# Altium PCB PINTY-FUJI-CARD-PCB-v1.1_2026-11-04.pcbdoc (part 1 of 2)
Units mil, origin at the board's own origin, x right, y up, seen from the top; angles counter-clockwise.
Board outline 3304.99 x 3610.47 mil, 2 copper layers (Top Layer, Bottom Layer); 76 components, 76 nets, 376 pads, 156 vias.
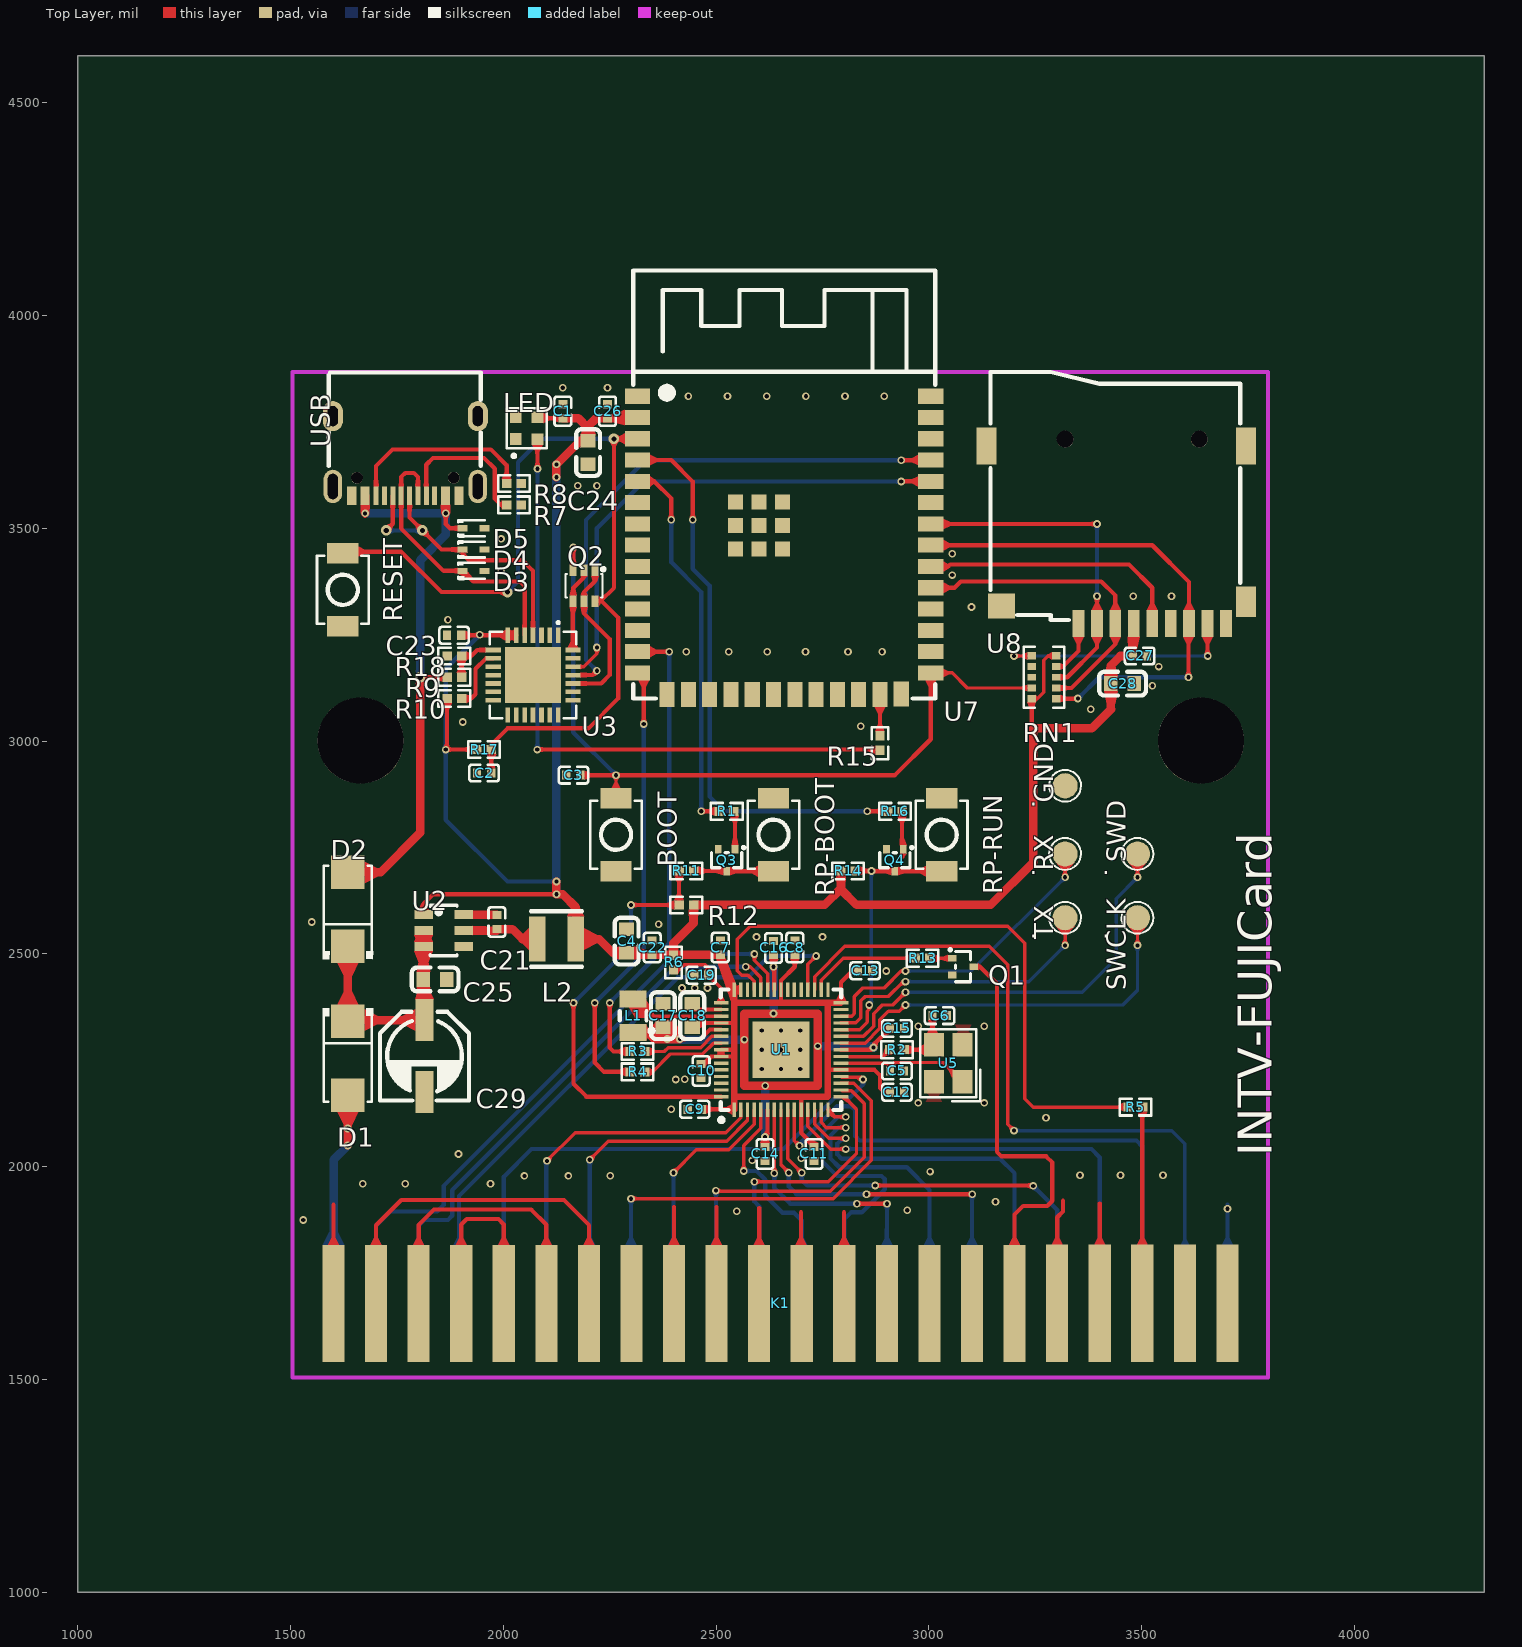
[diagram p0: Top Layer view]
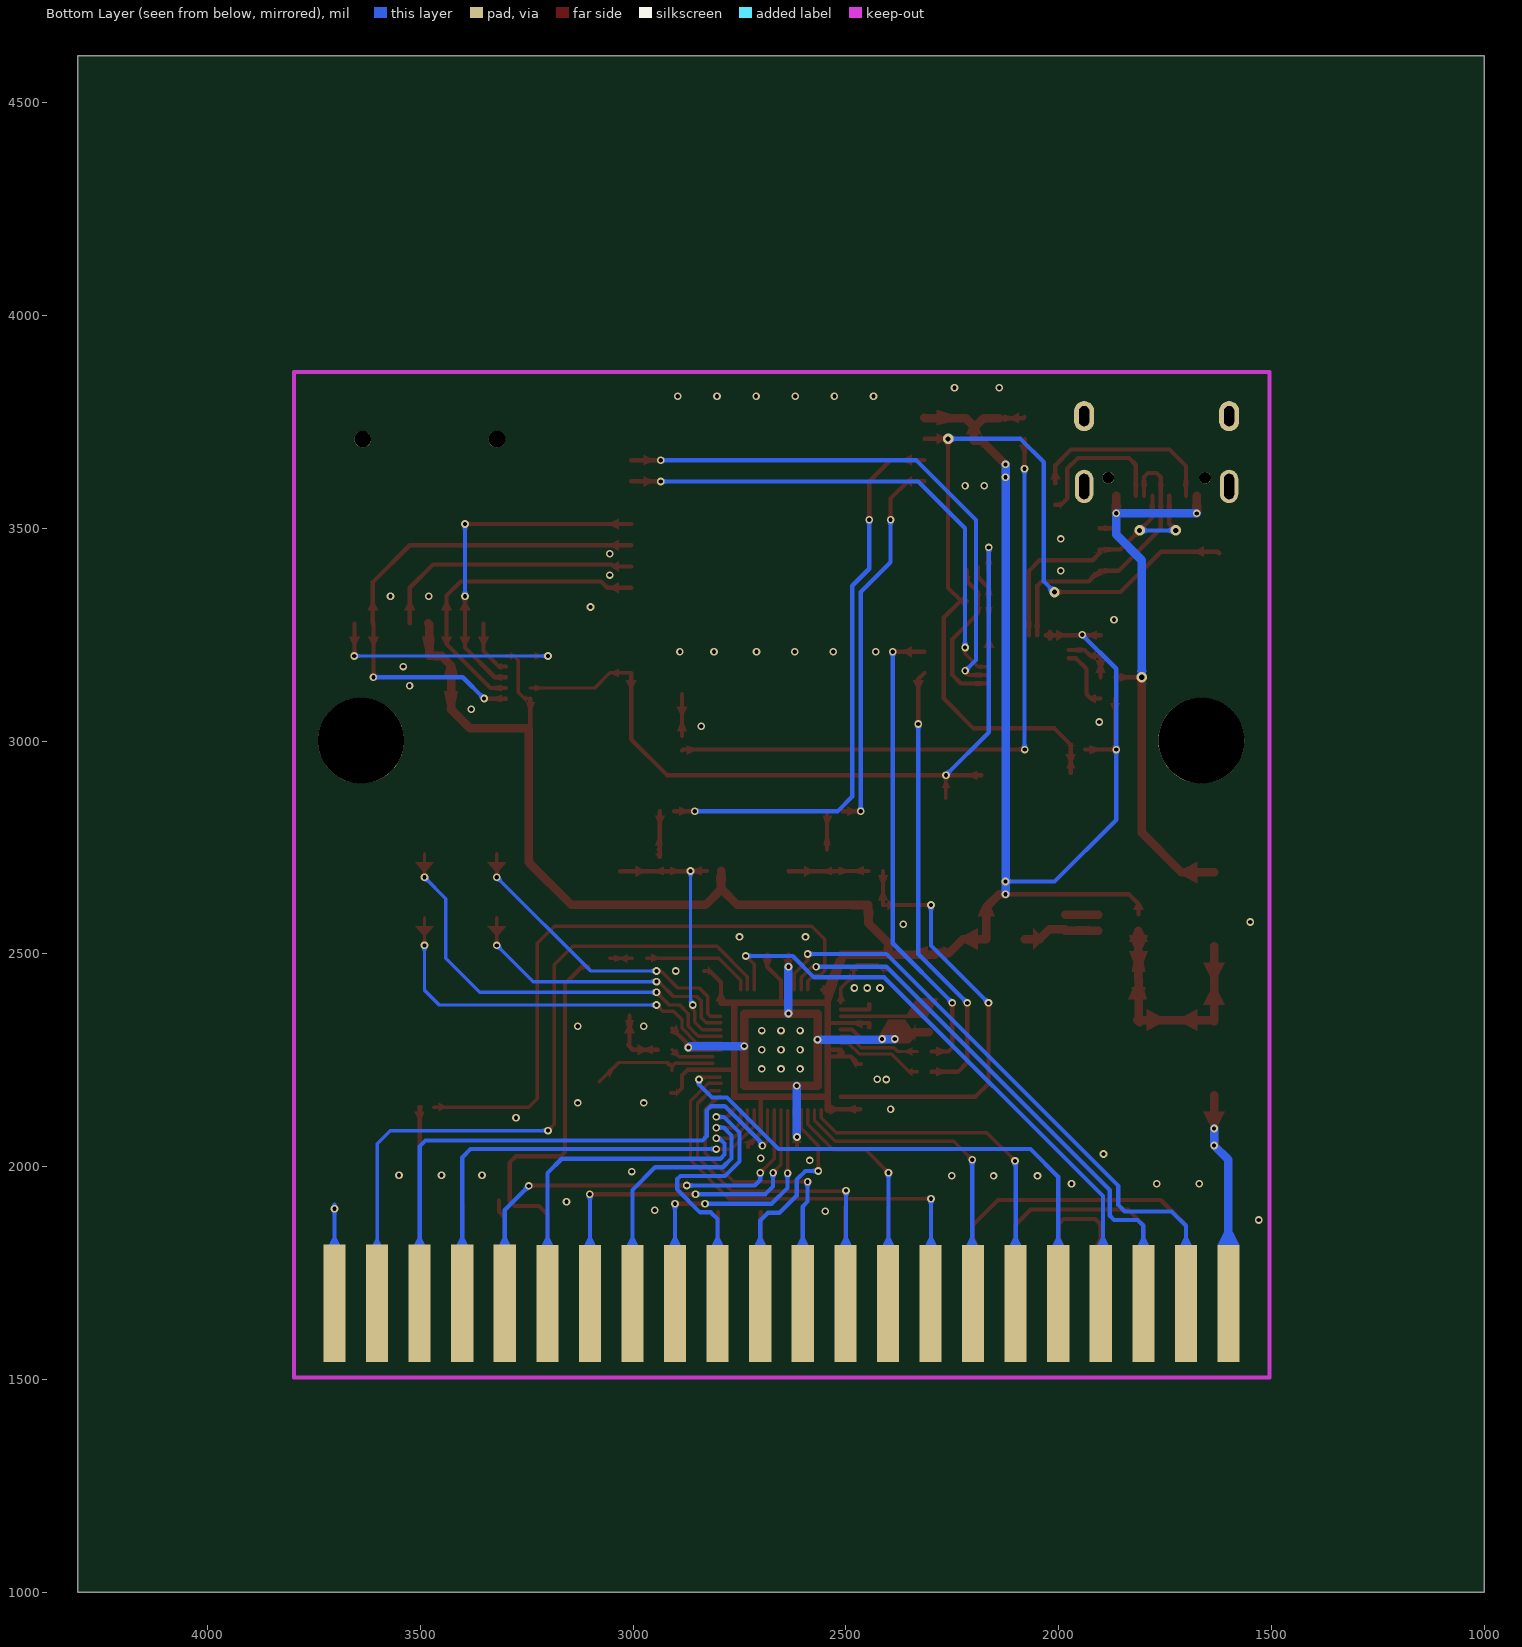
[diagram p1: Bottom Layer view, seen from below]

## Layer stack, top to bottom
Top Layer: signal copper (thickness not stored)
Dielectric: dielectric 12.6, FR-4, Dk 4.8
Bottom Layer: signal copper (thickness not stored)

## Board outline
4304.99,1000 1000,1000 1000,4610.47 4304.99,4610.47

## Components (designator, comment, footprint, x,y, rotation, side; value= is the part's Value field where it differs from the comment)
BOOT "TS-1088-AR02016" SW-SMD_L3.9-W3.0-P4.45 2265,2780 r270 top
C1 "100nF" C0402 2140,3774.99 r270 top
C2 "1uF" C0402 1955,2925 r0 top
C3 "100nF" C0402 2165,2920 r0 top
C4 "22uF" C0603 2290,2530 r270 top
C5 "15pF" C0402 2925,2225 r180 top
C6 "15pF" C0402 3025,2355 r180 top
C7 "100nF" C0402 2510,2515 r270 top
C8 "100nF" C0402 2685,2515 r270 top
C9 "100nF" C0402 2450,2135 r0 top
C10 "100nF" C0402 2465,2225 r90 top
C11 "100nF" C0402 2730,2030 r90 top
C12 "100nF" C0402 2925,2175 r180 top
C13 "100nF" C0402 2849.99,2460.45 r180 top
C14 "100nF" C0402 2615,2030 r90 top
C15 "100nF" C0402 2925,2325 r180 top
C16 "100nF" C0402 2635,2513.97 r270 top
C17 "4.7uF" C0603 2375,2355 r270 top
C18 "4.7uF" C0603 2443.97,2355 r270 top
C19 "4.7uF" C0402 2465,2450 r0 top
C21 "100nF" C0402 1985,2575 r90 top
C22 "100nF" C0402 2350,2515 r270 top
C23 "100nF" C0402 1884.49,3248.66 r0 top
C24 "22uF" C0603 2199.49,3677.75 r90 top
C25 "10uF" C0603 1840,2440 r180 top
C26 "100nF" C0402 2245,3774.99 r270 top
C27 "100nF" C0402 3495,3200 r180 top
C28 "10uF" C0603 3455,3135 r0 top
C29 "100uF" CAP-SMD_BD5.0-L5.3-W5.3-RD 1815,2260 r90 top
D1 "SS34_C8678" SMA_L4.3-W2.6-LS5.2-RD 1635,2255 r270 top
D2 "SS34_C8678" SMA_L4.3-W2.6-LS5.2-RD 1635,2605 r90 top
D3 "ESD5Z5.0T1G_C343989" SOD-523_L1.2-W0.8-LS1.6-RD 1930,3400 r0 top
D4 "ESD5Z5.0T1G_C343989" SOD-523_L1.2-W0.8-LS1.6-RD 1930,3450 r0 top
D5 "ESD5Z5.0T1G_C343989" SOD-523_L1.2-W0.8-LS1.6-RD 1930,3500 r0 top
GND "TESTPAD" TESTPOINT:TESTPOINT_PAD_D1.5MM 3320,2895 r90 top
K1 "PCB_EDGE_22x2_2.54mm" PCB_EDGE_CONNECTOR_22X2 2701.22,1678.7 r0 top
L1 "3.3uH" IND-SMD_L2.0-W1.6_AOTA-B201610S3R3-101-T 2305,2355 r270 top
L2 "4.7uH" IND-SMD_L3.0-W3.0-1 2125,2535 r0 top
LED "SK6805-EC20" LED-SMD_4P-L2.0-W2.0-TL_J-ST2020RGB-IC-P4-5-SO1 2055,3735 r90 top
Q1 "BC847BT" SOT-523-3_L1.6-W0.8-P1.00-LS1.6-BR 3080,2470 r180 top
Q2 "UMH3NTN" SOT-363_L2.0-W1.3-P0.65-LS2.1-TL 2190,3365 r270 top
Q3 "BC847BT" SOT-523-3_L1.6-W0.8-P1.00-LS1.6-BR 2525,2720 r90 top
Q4 "BC847BT" SOT-523-3_L1.6-W0.8-P1.00-LS1.6-BR 2920,2720 r90 top
R1 "1kΩ" R0402 2525,2835 r180 top
R2 "1kΩ" R0402 2925,2275 r0 top
R3 "27Ω" R0402 2315.71,2270.83 r180 top
R4 "27Ω" R0402 2315.71,2222.96 r180 top
R5 "1kΩ" R0402 3485,2140 r180 top
R6 "27Ω" R0402 2400,2480 r270 top
R7 "5.1kΩ" R0402 2025,3555 r180 top
R8 "5.1kΩ" R0402 2025,3605 r180 top
R9 "22.1kΩ" R0402 1885,3150 r180 top
R10 "1kΩ" R0402 1885,3100 r180 top
R11 "1kΩ" R0402 2430,2695 r0 top
R12 "10kΩ" R0402 2430,2615 r180 top
R13 "1kΩ" R0402 2985,2490 r180 top
R14 "10kΩ" R0402 2810,2695 r0 top
R15 "330Ω" R0402 2885,2995 r270 top
R16 "1kΩ" R0402 2920,2835 r180 top
R17 "10kΩ" R0402 1955,2980 r0 top
R18 "47.5kΩ" R0402 1885,3200 r0 top
RESET "TS-1088-AR02016" SW-SMD_L3.9-W3.0-P4.45 1623.11,3355.39 r270 top
RN1 "10kΩ" RES-ARRAY-SMD_1206-L3.2-W1.6-P0.64 3270,3150 r90 top
RP-BOOT "TS-1088-AR02016" SW-SMD_L3.9-W3.0-P4.45 2635,2780 r90 top
RP-RUN "TS-1088-AR02016" SW-SMD_L3.9-W3.0-P4.45 3030,2780 r90 top
RX "TESTPAD" TESTPOINT:TESTPOINT_PAD_D1.5MM 3319.97,2734.99 r90 top
SWCLK "TESTPAD" TESTPOINT:TESTPOINT_PAD_D1.5MM 3489.97,2584.99 r90 top
SWD "TESTPAD" TESTPOINT:TESTPOINT_PAD_D1.5MM 3489.97,2734.99 r90 top
TX "TESTPAD" TESTPOINT:TESTPOINT_PAD_D1.5MM 3319.97,2584.99 r90 top
U1 "RP2354A" QFN-60_L7.0-W7.0-P0.40-TL-EP3.4 2652.57,2274.89 r90 top
U2 "AP63203WU-7" TSOT-26_L2.9-W1.6-P0.95-LS2.8-BL 1860,2555 r270 top
U3 "CP2102N-A02-GQFN28R" QFN-28_L5.0-W5.0-P0.50-TL-EP3.3 2070,3155 r270 top
U5 "12MHz" CRYSTAL-SMD_4P-L3.2-W2.5-BL 3045.58,2243.19 r90 top
U7 "ESP32-S3-WROOM-1(N16R8)" WIRELM-SMD_ESP32-S3-WROOM-1 2660,3460 r0 top
U8 "TF-CARD-9P" SIM-SMD_LX_XDFP-0090-012 3440,3485 r180 top
USB "TYPE-C 16PIN 2MD(073)" USB-C-SMD_TYPE-C-6PIN-2MD-073 1770.03,3669.98 r180 top

## Footprints (in the part's own frame and the unit in brackets; to place one, negate y for a bottom-side part, rotate by r counter-clockwise, add the part's x,y. Pads: shape width x height; smd on the part's side, far side on the other; paste and mask are expansions set on the pad)
C0402 [mm]
  rect 0.5x0.54 smd paste+0 mask+0.051: 1(-0.42,0) 2(0.42,0)
  silkscreen extent -0.87,-0.5 0.87,0.5
C0603 [mm]
  rect 0.8x0.9 smd paste+0 mask+0.051: 1(-0.7,0) 2(0.7,0)
  silkscreen extent -1.39,-0.71 1.39,0.71
CAP-SMD_BD5.0-L5.3-W5.3-RD [mm]
  rect 2.5x1.1 smd paste+0 mask+0.051: 1(2.15,0) 2(-2.15,0)
  silkscreen extent -2.65,-2.65 2.64,2.65
CRYSTAL-SMD_4P-L3.2-W2.5-BL [mm]
  rect 1.4x1.2 smd paste+0 mask+0.051: 1(-1.1,-0.85) 2(1.1,-0.85) 3(1.1,0.85) 4(-1.1,0.85)
  silkscreen extent -2.26,-1.91 2.03,1.68
IND-SMD_L2.0-W1.6_AOTA-B201610S3R3-101-T [mm]
  rect 1x1.6 smd paste+0 mask+0.05: 1(-1,0) 2(1,0)
  silkscreen extent -0.27,-0.8 1.03,1.23
IND-SMD_L3.0-W3.0-1 [mm]
  rect 1x2.7 smd paste+0 mask+0.051: 1(-1.15,0) 2(1.15,0)
  silkscreen extent -1.52,-1.65 1.52,1.65
LED-SMD_4P-L2.0-W2.0-TL_J-ST2020RGB-IC-P4-5-SO1 [mm]
  rect 0.7x0.7 smd paste+0 mask+0.051: 1(-0.65,0.65) 2(-0.65,-0.65) 3(0.65,-0.65) 4(0.65,0.65)
  silkscreen extent -1.75,-1.2 1.2,1.2
PCB_EDGE_CONNECTOR_22X2 [mil]
  rect 52x275.6 smd paste+0 mask+4: A1(-1100,0) A2(-1000,0) A3(-900,0) A4(-800,0) A5(-700,0) A6(-600,0) A7(-500,0) A8(-400,0) A9(-300,0) A10(-200,0) A11(-100,0) A12(0,0) A13(100,0) A14(200,0) A15(300,0) A16(400,0) A17(500,0) A18(600.1,0.6) A19(700.1,0.6) A20(800.1,0.6) A21(900.1,0.6) A22(1000.1,0.6)
  rect 52x275.6 smd far side paste+0 mask+4: B1(-1100,0) B2(-1000,0) B3(-900,0) B4(-800,0) B5(-700,0) B6(-600,0) B7(-500,0) B8(-400,0) B9(-300,0) B10(-200,0) B11(-100,0) B12(0,0) B13(100,0) B14(200,0) B15(300,0) B16(400,0) B17(500,0) B18(600.1,0.6) B19(700.1,0.6) B20(800.1,0.6) B21(900.1,0.6) B22(1000.1,0.6)
QFN-28_L5.0-W5.0-P0.50-TL-EP3.3 [mm]
  rect 0.905x0.28 smd paste-100 mask+0.051: 1(-2.378,1.5) 2(-2.378,1) 3(-2.378,0.5) 4(-2.378,0) 5(-2.378,-0.5) 6(-2.378,-1) 7(-2.378,-1.5) 15(2.377,-1.5) 16(2.377,-1) 17(2.377,-0.5) 18(2.377,0) 19(2.377,0.5) 20(2.377,1) 21(2.377,1.5)
  rect 0.28x0.905 smd paste-100 mask+0.051: 8(-1.5,-2.377) 9(-1,-2.377) 10(-0.5,-2.377) 11(0,-2.377) 12(0.5,-2.377) 13(1,-2.377) 14(1.5,-2.377) 22(1.5,2.377) 23(1,2.377) 24(0.5,2.377) 25(0,2.377) 26(-0.5,2.377) 27(-1,2.377) 28(-1.5,2.377)
  rect 3.35x3.35 smd paste-100 mask+0.051: 29(0,0)
  silkscreen extent -3.2,-2.58 2.58,2.58
QFN-60_L7.0-W7.0-P0.40-TL-EP3.4 [mm]
  rect 0.875x0.2 smd paste-100 mask+0.051: 1(-3.575,2.8) 2(-3.575,2.4) 3(-3.575,2) 4(-3.575,1.6) 5(-3.575,1.2) 6(-3.575,0.8) 7(-3.575,0.4) 8(-3.575,0) 9(-3.575,-0.4) 10(-3.575,-0.8) 11(-3.575,-1.2) 12(-3.575,-1.6) 13(-3.575,-2) 14(-3.575,-2.4) 15(-3.575,-2.8) 31(3.575,-2.8) 32(3.575,-2.4) 33(3.575,-2) 34(3.575,-1.6) 35(3.575,-1.2) 36(3.575,-0.8) 37(3.575,-0.4) 38(3.575,0) 39(3.575,0.4) 40(3.575,0.8) 41(3.575,1.2) 42(3.575,1.6) 43(3.575,2) 44(3.575,2.4) 45(3.575,2.8)
  rect 0.2x0.875 smd paste-100 mask+0.051: 16(-2.8,-3.575) 17(-2.4,-3.575) 18(-2,-3.575) 19(-1.6,-3.575) 20(-1.2,-3.575) 21(-0.8,-3.575) 22(-0.4,-3.575) 23(0,-3.575) 24(0.4,-3.575) 25(0.8,-3.575) 26(1.2,-3.575) 27(1.6,-3.575) 28(2,-3.575) 29(2.4,-3.575) 30(2.8,-3.575) 46(2.8,3.575) 47(2.4,3.575) 48(2,3.575) 49(1.6,3.575) 50(1.2,3.575) 51(0.8,3.575) 52(0.4,3.575) 53(0,3.575) 54(-0.4,3.575) 55(-0.8,3.575) 56(-1.2,3.575) 57(-1.6,3.575) 58(-2,3.575) 59(-2.4,3.575) 60(-2.8,3.575)
  rect 3.4x3.4 smd paste-100 mask+0.051: 61(0,0)
  silkscreen extent -4.32,-3.6 3.6,3.68
R0402 [mm]
  rect 0.566x0.54 smd paste-100 mask+0.051: 1(-0.433,0) 2(0.433,0)
  silkscreen extent -0.94,-0.5 0.94,0.5
RES-ARRAY-SMD_1206-L3.2-W1.6-P0.64 [mm]
  rect 0.45x0.505 smd paste+0 mask+0.051: 1(-1.28,-0.728) 5(1.28,-0.728) 6(1.28,0.728) 10(-1.28,0.728)
  rect 0.4x0.505 smd paste+0 mask+0.051: 2(-0.64,-0.728) 3(0,-0.728) 4(0.64,-0.728) 7(0.64,0.728) 8(0,0.728) 9(-0.64,0.728)
  silkscreen extent -1.83,-1.21 1.83,1.21
SIM-SMD_LX_XDFP-0090-012 [mm]
  rect 0.7x1.6 smd paste+0 mask+0.051: 1(2.25,5.3) 2(1.15,5.3) 3(0.05,5.3) 4(-1.05,5.3) 5(-2.15,5.3) 6(-3.25,5.3) 7(-4.35,5.3) 8(-5.45,5.3) 9(-6.55,5.3)
  rect 1.2x2.2 smd paste+0 mask+0.051: 10(-7.75,-5.3) 10(7.75,-5.3)
  rect 1.2x1.8 smd paste+0 mask+0.051: 10(-7.75,4)
  rect 1.6x1.5 smd paste+0 mask+0.051: 10(6.85,4.25)
  round 1 hole 1 unplated paste+0: ""(-4.95,-5.7) ""(3.05,-5.7)
  silkscreen extent -7.4,-9.7 7.5,5.1
SMA_L4.3-W2.6-LS5.2-RD [mm]
  rect 2x2 smd paste+0 mask+0.051: 1(-2.2,0) 2(2.2,0)
  silkscreen extent -2.98,-1.5 2.6,1.5
SOD-523_L1.2-W0.8-LS1.6-RD [mm]
  rect 0.6x0.36 smd paste+0 mask+0.051: 1(-0.65,0) 2(0.65,0)
  silkscreen extent -0.91,-0.55 0.68,0.55
SOT-363_L2.0-W1.3-P0.65-LS2.1-TL [mm]
  rect 0.7x0.42 smd paste+0 mask+0.051: 1(-0.92,0.65) 2(-0.92,0) 3(-0.92,-0.65) 4(0.92,-0.65) 5(0.92,0) 6(0.92,0.65)
  silkscreen extent -1.09,-1.1 0.7,1.24
SOT-523-3_L1.6-W0.8-P1.00-LS1.6-BR [mm]
  rect 0.51x0.4 smd paste+0 mask+0.051: 1(0.65,-0.5) 2(0.65,0.5) 3(-0.65,0)
  silkscreen extent -0.45,-1.08 0.83,0.9
SW-SMD_L3.9-W3.0-P4.45 [mm]
  rect 1.23x1.86 smd paste+0 mask+0.051: 1(-2.185,0) 2(2.185,0)
  silkscreen extent -2.03,-1.54 2.03,1.54
TESTPOINT:TESTPOINT_PAD_D1.5MM [mm]
  round 1.5 smd paste+0 mask+0.051: 1(0,0)
  silkscreen extent -0.95,-0.95 0.95,0.95
TSOT-26_L2.9-W1.6-P0.95-LS2.8-BL [mm]
  rect 0.55x1.1 smd paste+0 mask+0.05: 1(-0.95,-1.2) 2(0,-1.2) 3(0.95,-1.2) 4(0.95,1.2) 5(0,1.2) 6(-0.95,1.2)
  silkscreen extent -1.5,-0.8 1.5,0.8
USB-C-SMD_TYPE-C-6PIN-2MD-073 [mm]
  rect 0.55x1.1 smd paste-100 mask+0.05: 1(-3.2,2.375) 2(-2.4,2.375) 11(2.4,2.375) 12(3.2,2.375)
  rect 0.3x1.1 smd paste-100 mask+0.05: 3(-1.75,2.375) 4(-1.25,2.375) 5(-0.75,2.375) 6(-0.25,2.375) 7(0.25,2.375) 8(0.75,2.375) 9(1.25,2.375) 10(1.75,2.375)
  oval 1.2x1.8 hole 0.6 slot 1.2 at 90 deg paste+0 mask+0.05: 13(-4.325,-2.375) 14(4.325,-2.375)
  oval 1.1x2 hole 0.6 slot 1.5 at 90 deg paste+0 mask+0.05: 13(-4.325,1.825) 14(4.325,1.825)
  round 0.7 hole 0.7 unplated paste+0: ""(-2.89,1.305) ""(2.89,1.305)
  silkscreen extent -4.5,-4.97 4.57,0.6
WIRELM-SMD_ESP32-S3-WROOM-1 [mm]
  rect 1.5x0.9 smd paste+0 mask+0.05: 1(-8.75,8.895) 2(-8.75,7.625) 3(-8.75,6.355) 4(-8.75,5.085) 5(-8.75,3.815) 6(-8.75,2.545) 7(-8.75,1.275) 8(-8.75,0.005) 9(-8.75,-1.265) 10(-8.75,-2.535) 11(-8.75,-3.805) 12(-8.75,-5.075) 13(-8.75,-6.345) 14(-8.75,-7.615) 27(8.75,-7.615) 28(8.75,-6.345) 29(8.75,-5.075) 30(8.75,-3.805) 31(8.75,-2.535) 32(8.75,-1.265) 33(8.75,0.005) 34(8.75,1.275) 35(8.75,2.545) 36(8.75,3.815) 37(8.75,5.085) 38(8.75,6.355) 39(8.75,7.625) 40(8.75,8.895)
  rect 0.9x1.5 smd paste+0 mask+0.05: 15(-6.985,-8.895) 16(-5.715,-8.895) 17(-4.445,-8.895) 18(-3.175,-8.895) 19(-1.905,-8.895) 20(-0.635,-8.895) 21(0.635,-8.895) 22(1.905,-8.895) 23(3.175,-8.895) 24(4.445,-8.895) 25(5.715,-8.895) 26(6.985,-8.865)
  rect 0.9x0.9 smd paste+0 mask+0.051: 41(-2.9,-0.225) 41(-2.9,1.175) 41(-2.9,2.575) 41(-1.501,-0.225) 41(-1.501,1.175) 41(-1.501,2.575) 41(-0.1,-0.225) 41(-0.1,1.175) 41(-0.1,2.575)
  silkscreen extent -9,-9.14 9.02,16.39

## Free pads (board coordinates)
  round 201.85 hole 201.85 unplated paste+0: ""(1665.01,3001.06) ""(3638.86,3001.06)

## Via types
v1: diameter 17.99, hole 10, Top Layer to Bottom Layer, tented both sides, 151 vias
v2: diameter 24.41, hole 12.2, Top Layer to Bottom Layer, tented both sides, 5 vias

## Nets (pads, with @x,y where several pads share a name; then routed paths per layer and width w, separated by ;. In a path a pad name is that pad's centre, name@x,y a point inside that pad or via, vN(x,y) a via of type N, cw(c..) or ccw(c..) an arc to the next point about the centre after c; other vN are vias at no path point)
1V1: C14.2 C15.2 C16.2 C17.2 L1.2 U1.6 U1.23 U1.39 U1.50 | length 1899.5
  Top Layer w10: L1.2@2305,2315.63 2345.57,2315.59 2357.47,2327.39 C17.2@2375,2327.44 2387.57,2327.39 v1(2414.99,2300) 2463.66,2299.99 2485.86,2322.19 U1.50@2511.86,2322.19 ; C14.2@2616.97,2041.59 2615.07,2041.59 2614.97,2041.59 v1(2614.99,2070) 2620.57,2075.59 2620.57,2106.59 U1.6@2621.07,2133.89 ; C16.2@2634.97,2498.49 v1(2634.99,2470) 2636.86,2469.99 U1.39@2636.86,2415.59 ; U1.23@2793.31,2274.89 2864.86,2274.89 v1(2869.99,2280) 2869.97,2286.49 C15.2@2908.47,2325
  Top Layer w19.68: L1.2@2305,2315.63 2338.97,2315.59 2354.57,2299.99 v1(2384.99,2300)
  Top Layer w20: v1(2384.99,2300) v1(2414.99,2300) ; v1(2566.57,2298.7) 2566.57,2190.19 v1(2615.55,2190.2) 2739.07,2190.19 2739.07,2283.39 2739.07,2359.99 v1(2634.99,2360) ; v1(2566.57,2298.7) 2566.57,2360 v1(2634.99,2360)
  Bottom Layer w20: v1(2384.99,2300) v1(2414.99,2300) 2416.3,2298.7 v1(2566.57,2298.7) ; v1(2614.99,2070) 2615.55,2070.55 v1(2615.55,2190.2) ; v1(2634.99,2360) v1(2634.99,2470) ; v1(2739.01,2283.43) 2866.56,2283.43 v1(2869.99,2280)
3V3: C1.2 C4.2 C7.2 C8.2 C9.2 C10.2 C11.2 C12.2 C13.2 C18.2 C22.2 C23.2 C24.2 C26.2 C27.2 C28.1 L2.2 LED.3 R6.1 R10.2 R12.1 R14.1 R17.1 RN1.5 RN1.10 U1.1 U1.11 U1.20 U1.30 U1.38 U1.44 U1.45 U1.49 U1.53 U1.54 U2.1 U3.6 U3.7 U7.2 U8.4 | length 7644
  Top Layer w7.99: U1.54@2511.76,2259.19 U1.53@2511.82,2274.89 ; RN1.10@3241.35,3099.6 3254.57,3099.59 3269.97,3114.99 3269.97,3189.99 3280.36,3200.39 RN1.5@3298.66,3200.39
  Top Layer w10: U2.1@1812.76,2592.4 1812.77,2617.79 1834.96,2639.99 v1(2124.99,2640) ; R10.2@1867.96,3100 1867.96,2982.99 v1(1864.99,2980) 1905.96,2979.99 R17.1@1937.96,2980 ; C23.2@1901.07,3248.69 1943.66,3248.69 v1(1944.99,3250) 1946.37,3248.59 1956.37,3248.59 2010.96,3248.59 U3.6@2030.66,3248.59 ; LED.3@2080.59,3760.6 2082.66,3758.49 C1.2@2140,3758.46 ; C18.2@2444.97,2327.39 2444.97,2337.89 2511.86,2337.89 2542.36,2337.89 ; C10.2@2465,2241.53 2471.47,2241.49 2489.16,2259.19 U1.54@2511.76,2259.19 ; C9.2@2466.57,2134.99 2541.57,2134.99 U1.1@2542.36,2134.19 ; C7.2@2510,2498.47 2509.97,2489.99 2519.97,2479.99 2519.97,2449.99 2542.36,2427.59 2542.36,2415.59 U1.44@2555.76,2415.59 ; U1.54@2511.86,2259.19 2542.36,2259.19 ; U1.53@2511.86,2274.89 2542.36,2274.89 ; 2652.57,2385.09 U1.38@2652.57,2415.63 ; U1.38@2652.57,2415.89 2652.57,2437.59 2684.97,2469.99 C8.2@2685,2498.47 ; U1.11@2699.86,2133.89 2699.86,2080.09 2729.97,2049.99 C11.2@2729.97,2046.59 ; U1.11@2699.86,2134.19 2699.86,2164.89 ; 2762.07,2225.99 2763.66,2227.69 U1.20@2793.26,2227.69 ; U1.30@2793.31,2385.13 2793.26,2433.29 2819.97,2459.99 C13.2@2833.47,2459.99 ; U1.20@2793.36,2227.69 2872.36,2227.69 2885.16,2214.79 2885.16,2184.79 2896.86,2173.09 C12.2@2910.16,2173.09 ; RN1.10@3241.35,3099.6 3241.36,3036.09 3244.97,3032.49
  Top Layer w15: U1.1@2542.36,2134.19 U1.45@2542.36,2415.59 ; 2542.33,2164.89 2762.04,2164.89 2762.04,2385.12 ; 2542.36,2385.09 U1.30@2793.31,2385.13
  Top Layer w20: v1(2124.99,2640) 2140.07,2639.99 2170.26,2609.79 L2.2@2170.28,2535 2224.97,2534.99 2257.57,2502.39 C4.2@2290,2502.44 2289.97,2498.49 C22.2@2350,2498.47 R6.1@2398.57,2498.49 ; v1(2124.99,3650) 2180.36,3705.29 C24.2@2199.49,3705.31 ; v1(2124.99,2640) v1(2124.99,2670) ; v1(2124.99,3620) v1(2124.99,3650) ; C1.2@2140,3758.46 2176.57,3758.49 2199.47,3735.49 C24.2@2199.49,3705.31 ; U7.2@2315.47,3759.89 2314.07,3758.49 C26.2@2245,3758.46 2218.47,3758.49 2199.47,3739.49 C24.2@2199.49,3705.31 ; C7.2@2510,2498.47 2401.36,2498.49 R6.1@2398.57,2498.49 ; U8.4@3481.36,3276.39 3478.47,3273.49 C27.2@3478.46,3200 3449.97,3199.99 3427.47,3177.39 3427.47,3134.99 3427.47,3075.49 3427.97,3074.99 3382.97,3029.99 3244.97,3029.99 3244.97,2714.99 3144.97,2614.99 2829.97,2614.99 2792.97,2652.09 R14.1@2792.96,2695 2792.97,2652.99 2754.97,2614.99 2447.07,2614.99 2447.07,2571.99 2399.97,2524.99 2399.97,2499.99 R6.1@2398.57,2498.49
  Bottom Layer w10: v1(1944.99,3250) 1865,3170 v1(1864.99,2980) 1865,2815 2010,2670 v1(2124.99,2670)
  Bottom Layer w20: v1(2124.99,2640) v1(2124.99,2670) ; 2125,2814.99 v1(2124.99,2670) ; v1(2124.99,3650) v1(2124.99,3620) 2125,3650.39 v1(2124.99,2670)
AUD: K1.A20 R5.1 | length 467.2
  Top Layer w10: K1.A20@3501.36,1679.29 3501.36,2139.99 3498.47,2139.99 R5.1@3502.04,2140
BOOTSEL_CTL: R1.2 U7.5 | length 903.1
  Top Layer w10: U7.5@2315.51,3610.19 2354.76,3610.19 2394.97,3569.99 v1(2394.99,3520) ; v1(2464.99,2835) R1.2@2507.96,2835
  Bottom Layer w10: v1(2394.99,3520) 2395,3420 2465,3350 v1(2464.99,2835)
CART_RST: K1.A17 Q1.3 | length 1007.5
  Top Layer w10: Q1.3@3105.59,2470 3119.97,2469.99 3159.97,2429.99 3159.97,2034.99 3170.47,2024.49 3275.47,2024.49 3289.97,2009.99 3289.97,1919.99 3277.97,1907.99 3221.36,1907.99 3201.26,1887.89 K1.A17@3201.26,1678.69
CC1: R7.2 USB.4 | length 354.6
  Top Layer w10: USB.4@1819.24,3576.48 1819.16,3649.19 1834.96,3664.99 1954.96,3664.99 1979.96,3639.99 1979.96,3569.99 1994.96,3554.99 R7.2@2007.96,3555
CC2: R8.2 USB.10 | length 450.8
  Top Layer w10: USB.10@1701.16,3576.49 1701.16,3646.09 1739.96,3684.99 1970.87,3684.99 2007.96,3647.99 R8.2@2007.96,3604.99
CP_RST: R10.1 U3.9 | length 148.5
  Top Layer w10: R10.1@1902.07,3099.99 1924.96,3099.99 1934.96,3109.99 1934.96,3169.99 1959.37,3194.39 U3.9@1976.4,3194.37
GND: BOOT.2 C1.1 C2.1 C3.1 C4.1 C5.1 C6.1 C7.1 C8.1 C9.1 C10.1 C11.1 C12.1 C13.1 C14.1 C15.1 C16.1 C17.1 C18.1 C19.1 C22.1 C23.1 C24.1 C25.1 C26.1 C27.1 C28.2 C29.2 D3.2 D4.2 D5.2 GND.1 K1.A1 K1.A9 K1.A10 K1.A11 K1.A12 K1.A13 K1.A18 K1.A19 K1.B22 LED.1 Q1.2 Q3.2 Q4.2 R7.1 R8.1 R18.1 RESET.2 RP-BOOT.2 RP-RUN.2 U1.47 U1.61 U2.4 U3.3 U3.23 U3.29 U5.2 U5.4 U7.1 U7.40 U7.41 U8.6 U8.10 USB.1 USB.12 USB.13 USB.14 | length 2140.6
  Top Layer w10: K1.A1@1601.27,1678.69 1601.27,1910.49 ; K1.A9@2401.26,1678.69 2401.26,1905.49 ; C18.1@2444.97,2382.59 2444.97,2369.39 U1.47@2511.82,2369.37 ; K1.A10@2501.26,1678.69 2501.26,1905.49 ; K1.A11@2601.26,1678.69 2601.26,1902.99 ; K1.A12@2699.76,1668.59 2699.76,1892.89 ; 2800.57,1892.89 K1.A13@2801.26,1678.69 ; K1.A18@3301.36,1679.29 3301.36,1881.39 3314.97,1894.99 3314.97,1919.99 ; K1.A19@3401.36,1679.29 3401.36,1913.59
  Bottom Layer w10: K1.B22@3701.36,1679.29 3701.36,1911.09
  other v1: 1530.01,1875 2548.61,1895.4 2949.24,1897.92 3701.36,1901.13 3156.49,1918.08 1670.01,1960 1769.99,1960 1969.99,1960 2049.72,1978.55 2153.03,1978.55 2251.57,1978.74 3354.99,1980 3449.99,1980 3549.99,1980 3002.8,1988.63 2584.99,2015 2699.99,2020 1894.99,2030 3274.99,2115 2394.99,2135 2974.99,2150 3129.99,2150 2404.99,2205 2426.41,2205.32 2607.57,2229.89 2652.57,2229.89 2697.57,2229.89 2607.57,2274.89 2652.57,2274.89 2697.57,2274.89 2607.57,2319.89 2652.57,2319.89 2697.57,2319.89 2974.99,2330 3129.99,2330 2419.99,2420 2449.99,2420 2479.99,2420 2899.99,2460 2594.99,2540 2749.99,2540 2364.99,2570 1550.01,2575 2839.99,3035 1904.99,3045 3379.99,3075 3524.99,3130 3539.99,3175 2429.99,3210 2529.99,3210 2619.99,3210 2709.99,3210 2809.99,3210 2889.99,3210 1869.99,3285 3099.99,3315 3479.99,3340 3569.99,3340 3054.99,3390 1994.99,3400 3054.99,3440 1994.99,3475 2174.99,3600 2219.99,3600 2434.99,3810 2526.99,3810 2618.99,3810 2710.99,3810 2802.99,3810 2894.99,3810 2139.99,3830 2244.99,3830
GPIO00: K1.B6 U1.2 | length 852.1
  Top Layer w7.99: v1@2102.66,2013.79 2168.86,2079.99 2522.97,2079.99 2558.07,2115.09 U1.2@2558.07,2134.19
  Bottom Layer w10: K1.B6@2101.26,1678.69 2101.26,2012.39 v1@2102.66,2013.79
  other v1: 2102.64,2013.82
GPIO01: K1.B7 U1.3 | length 772.6
  Top Layer w7.99: v1@2203.47,2016.39 2247.07,2059.99 2524.97,2059.99 2573.86,2108.89 U1.3@2573.86,2134.19
  Bottom Layer w10: K1.B7@2201.26,1678.69 2203.47,1680.89 v1@2203.47,2016.39
  other v1: 2203.43,2016.34
GPIO02: K1.B9 U1.4 | length 579.2
  Top Layer w7.99: v1(2399.95,1986.1) 2453.86,2039.99 2529.97,2039.99 2589.57,2099.59 U1.4@2589.57,2134.19
  Bottom Layer w10: v1(2399.95,1986.1) 2399.97,1679.99 K1.B9@2401.26,1678.69
GPIO03: K1.B12 U1.5 | length 562.4
  Top Layer w7.99: v1(2564.99,1990) 2564.97,2049.99 2605.26,2090.29 U1.5@2605.26,2134.19
  Bottom Layer w10: v1(2564.99,1990) 2595.26,1989.99 2615.57,1969.69 2615.57,1932.19 2655.86,1891.89 2683.16,1891.89 2701.26,1873.79 K1.B12@2701.26,1678.69
GPIO04: K1.B14 U1.7 | length 698.2
  Top Layer w7.99: U1.7@2636.97,2132.29 2636.97,1982.89 v1@2637.07,1982.89
  Top Layer w10: v1(2830.82,1913.03) v1(2901.38,1913.03)
  Bottom Layer w10: v1@2636.96,1984.89 2636.96,1950.49 2674.46,1912.99 v1@2830.87,1912.99 ; K1.B14@2901.26,1678.69 2901.26,1853.49 2901.36,1853.69 v1(2901.38,1913.03)
  other v1: 2636.97,1984.85
GPIO05: K1.B16 U1.8 | length 883.9
  Top Layer w7.99: U1.8@2652.57,2134.19 2652.57,2004.49 v1(2670.99,1986.11)
  Top Layer w10: v1(2853.51,1935.71) v1(3101.84,1935.72)
  Bottom Layer w10: v1(2670.99,1986.11) 2670.98,1953.35 2688.62,1935.71 v1(2853.51,1935.71) ; K1.B16@3101.26,1678.69 3101.26,1935.09 v1@3101.86,1935.69
GPIO06: K1.B18 U1.9 | length 1027.6
  Top Layer w7.99: U1.9@2668.26,2134.19 2668.26,2019.09 v1@2701.26,1986.09
  Top Layer w10: v1(2873.66,1955.87) 3244.13,1955.87 v1(3244.99,1955)
  Bottom Layer w10: v1@2701.27,1986.09 2701.27,1968.79 2714.17,1955.89 v1(2873.66,1955.87) ; v1(3244.99,1955) 3301.36,1898.59 K1.B18@3301.36,1679.29
  other v1: 2701.22,1986.11
GPIO07: K1.B20 U1.10 | length 1380
  Top Layer w7.99: U1.10@2684.07,2134.19 2684.07,2061.19 v1(2696.18,2049.1)
  Bottom Layer w10: v1(2696.18,2049.1) 2696.16,2054.09 2784.36,2142.29 2817.16,2142.29 2827.16,2132.29 2827.16,2071.79 2837.26,2061.69 3487.57,2061.69 3501.36,2047.89 K1.B20@3501.36,1679.29
GPIO08: K1.B19 U1.12 | length 1097.8
  Top Layer w7.99: U1.12@2715.57,2134.19 2715.57,2095.19 2769.26,2041.59 2786.86,2041.59 2786.97,2041.59 v1@2804.57,2041.59
  Bottom Layer w10: v1@2804.57,2041.59 3381.76,2041.59 3401.36,2021.99 K1.B19@3401.36,1679.29
  other v1: 2804.53,2041.54
GPIO09: K1.B17 U1.13 | length 912.6
  Top Layer w7.99: U1.13@2731.36,2134.19 2731.36,2099.59 2764.26,2066.79 v1@2804.57,2066.79
  Bottom Layer w10: v1@2804.57,2066.79 2796.97,2066.79 2784.97,2054.79 2784.97,2028.79 2794.97,2018.89 3167.36,2018.89 3201.26,1984.99 K1.B17@3201.26,1678.69
  other v1: 2804.53,2066.74
GPIO10: K1.B15 U1.14 | length 720.5
  Top Layer w7.99: U1.14@2747.07,2134.19 2747.07,2104.09 2759.26,2091.99 v1@2804.57,2091.99
  Bottom Layer w10: v1@2804.57,2091.99 2786.97,2091.99 2768.66,2073.69 2768.66,2019.29 2789.26,1998.69 2948.16,1998.69 3001.26,1945.59 K1.B15@3001.26,1678.69
  other v1: 2804.53,2091.94
GPIO11: K1.B13 U1.15 | length 696.2
  Top Layer w7.99: U1.15@2762.76,2134.19 2779.86,2117.09 v1@2804.57,2117.09
  Bottom Layer w10: K1.B13@2801.26,1678.69 2801.36,1877.09 2817.36,1892.89 2842.36,1892.89 2896.36,1946.89 2896.36,1970.99 2888.76,1978.59 2784.26,1978.59 2750.07,2012.69 2750.07,2080.49 2786.76,2117.09 v1@2804.57,2117.09
  other v1: 2804.53,2117.13
GPIO12: K1.B11 U1.16 | length 710.9
  Top Layer w7.99: v1(2589.99,1965) 2763.66,1964.99 2829.97,2031.29 2829.97,2134.49 2799.76,2164.69 U1.16@2793.31,2164.66
  Bottom Layer w10: v1(2589.99,1965) 2589.97,1918.19 2601.26,1906.89 K1.B11@2601.26,1678.69
GPIO13: K1.B10 U1.17 | length 835.8
  Top Layer w7.99: v1@2503.16,1942.59 2768.57,1942.59 2848.57,2022.59 2848.57,2148.59 2818.16,2178.99 U1.17@2796.86,2178.99
  Bottom Layer w10: v1(2499.61,1944.02) 2499.57,1678.69 K1.B10@2501.26,1678.69
GPIO14: K1.B8 U1.18 | length 1077.9
  Top Layer w7.99: v1(2299.99,1925) 2774.97,1924.99 2864.97,2014.99 2864.97,2154.99 2823.76,2196.19 U1.18@2793.26,2196.19
  Bottom Layer w10: v1(2299.99,1925) 2299.97,1679.99 K1.B8@2301.26,1678.69
GPIO15: K1.B5 U1.19 | length 1297.7
  Top Layer w7.99: U1.19@2794.97,2209.99 2839.76,2209.99 v1@2846.66,2203.09
  Bottom Layer w10: K1.B5@2001.27,1678.69 2001.27,1976.29 2066.57,2041.59 2658.36,2041.59 2779.26,2162.49 2814.57,2162.49 2844.97,2192.89 v1(2844.99,2205)
GPIO16: TX.1 U1.27 | length 690.5
  Top Layer w7.99: U1.27@2793.36,2337.89 2827.86,2337.89 2839.97,2349.99 2839.97,2389.99 2849.97,2399.99 2904.97,2399.99 2939.97,2434.99 v1(2944.99,2435) ; v1(3319.99,2520) TX.1@3319.97,2584.99
  Bottom Layer w7.99: v1(2944.99,2435) 3234.99,2435 v1(3319.99,2520)
GPIO17: RX.1 U1.28 | length 740.3
  Top Layer w7.99: U1.28@2793.36,2353.59 2818.66,2353.59 2824.97,2359.99 2824.97,2399.99 2844.97,2419.99 2894.97,2419.99 2934.97,2459.99 v1(2944.99,2460) ; v1(3319.99,2680) RX.1@3319.97,2734.99
  Bottom Layer w7.99: v1(2944.99,2460) 3099.99,2460 v1(3319.99,2680)
GPIO20: R13.2 U1.32 | length 264.8
  Top Layer w7.99: U1.32@2747.07,2415.59 2747.07,2437.99 2799.07,2489.99 R13.2@2967.96,2490
GPIO21: K1.B21 U1.33 | length 1716.7
  Top Layer w7.99: U1.33@2731.36,2415.59 2731.36,2446.39 2802.76,2517.79 3142.16,2517.79 3184.97,2474.99 3184.97,2099.99 v1(3199.99,2085)
  Bottom Layer w7.99: v1(3199.99,2085) 3570.07,2084.99 3601.36,2053.69 K1.B21@3601.36,1679.29
GPIO22: K1.B4 U1.34 | length 1416.9
  Top Layer w7.99: U1.34@2715.57,2415.89 2715.57,2475.59 v1(2734.99,2495)
  Bottom Layer w10: K1.B4@1896.27,1673.69 1896.27,1931.29 2409.97,2444.99 2574.97,2444.99 2624.97,2494.99 v1(2734.99,2495)
GPIO26: K1.B2 U1.40 | length 1459.5
  Top Layer w7.99: v1(2589.99,2500) 2589.97,2484.99 2621.07,2453.89 U1.40@2621.07,2415.63
  Bottom Layer w10: K1.B2@1701.27,1678.69 1701.27,1861.29 1734.96,1894.99 1844.96,1894.99 1859.96,1909.99 1859.96,1954.99 2404.97,2499.99 v1(2589.99,2500)
GPIO27: K1.B3 U1.41 | length 1313.5
  Top Layer w7.99: v1(2569.99,2470) 2579.97,2469.99 2605.26,2444.69 U1.41@2605.32,2415.63
  Bottom Layer w10: K1.B3@1801.27,1678.69 1801.27,1861.29 1814.96,1874.99 1869.96,1874.99 1879.96,1884.99 1879.96,1944.99 2404.97,2469.99 v1(2569.99,2470)
K1_A2: K1.A2 K1.A7 | length 916.9
  Top Layer w10: K1.A2@1701.27,1678.69 1701.27,1862.49 1760.46,1921.69 2142.47,1921.69 2201.26,1862.89 K1.A7@2201.26,1678.69
K1_A3: K1.A3 K1.A6 | length 699.3
  Top Layer w10: K1.A3@1801.27,1678.69 1801.27,1863.19 1837.37,1899.39 2065.57,1899.39 2101.26,1863.69 K1.A6@2101.26,1678.69
K1_A4: K1.A4 K1.A5 | length 481.8
  Top Layer w10: K1.A4@1901.27,1678.69 1901.27,1863.99 1914.27,1877.09 1988.66,1877.09 2001.27,1864.49 K1.A5@2001.27,1678.69
L1_1: L1.1 U1.48 | length 224
  Top Layer w7.99: L1.1@2305,2394.37 2345.36,2353.99 U1.48@2512.26,2353.99
LED_2: LED.2 R15.2 | length 1536.1
  Top Layer w10: v1(2079.99,2980) 2882.97,2979.99 R15.2@2885,2977.96 ; v1(2080.59,3640) 2079.97,3708.79 LED.2@2080.57,3709.89
  Bottom Layer w10: v1(2079.99,2980) 2080.58,2980.58 v1(2080.59,3640)
LED_STRIP: R15.1 U7.25 | length 97.7
  Top Layer w10: R15.1@2884.97,3012.09 U7.25@2885,3109.8
PWM: R5.2 U1.42 | length 1464.9
  Top Layer w7.99: U1.42@2589.57,2415.63 2589.57,2435.39 2574.97,2449.99 2559.97,2449.99 2549.97,2459.99 2549.97,2534.99 2579.97,2564.99 3184.97,2564.99 3224.97,2524.99 3224.97,2159.99 3244.97,2139.99 R5.2@3467.96,2140
QSPI_SS: R11.1 R12.2 U1.60 | length 1028.4
  Top Layer w10: v1(2164.99,2385) 2164.97,2194.99 2195.26,2164.69 U1.60@2511.86,2164.69 ; v1(2299.99,2615) R12.2@2412.96,2615 R11.1@2412.96,2695
  Bottom Layer w10: v1(2164.99,2385) 2299.97,2519.99 v1(2299.99,2615)
R1_1: Q3.1 R1.1 | length 90.5
  Top Layer w10: R1.1@2542.07,2834.99 2544.66,2832.39 Q3.1@2544.68,2745.59
R11_2: Q3.3 R11.2 RP-BOOT.1 | length 188.6
  Top Layer w10: R11.2@2447.07,2694.99 2524.47,2694.99 Q3.3@2525,2694.41 2634.97,2694.39 RP-BOOT.1@2635,2693.97
R13_1: Q1.1 R13.1 | length 52.4
  Top Layer w7.99: R13.1@3002.07,2489.99 3002.36,2489.69 Q1.1@3054.41,2489.68
R16_1: Q4.1 R16.1 | length 130.6
  Top Layer w10: R16.1@2937.07,2834.99 2937.07,2748.19 Q4.1@2939.68,2745.59 2937.36,2743.29 2937.36,2727.89 Q4.1@2937.36,2749.39
RUN: Q4.3 R14.2 RP-RUN.1 U1.26 | length 631.3
  Top Layer w7.99: U1.26@2793.36,2322.19 2837.16,2322.19 2854.97,2339.99 2854.97,2364.99 2859.97,2369.99 v1(2859.99,2380)
  Top Layer w10: R14.2@2827.07,2694.99 v1(2864.99,2695) 2865.57,2694.39 Q4.3@2920,2694.41 RP-RUN.1@3030,2693.97
  Bottom Layer w7.99: v1(2859.99,2380) 2865,2385 v1(2864.99,2695)
RUN_CTL: R16.2 U7.4 | length 1339.4
  Top Layer w10: U7.4@2315.51,3660.19 2394.76,3660.19 2444.97,3609.99 v1(2444.99,3520) ; v1(2854.99,2835) R16.2@2902.96,2835
  Bottom Layer w10: v1(2444.99,3520) 2444.97,3404.99 2484.97,3364.99 2484.97,2869.99 2519.97,2834.99 v1(2854.99,2835)
S3_EN: C2.2 Q2.6 R17.2 RESET.1 U7.3 | length 2110
  Top Layer w10: RESET.1@1623.11,3441.41 1626.66,3444.99 1759.96,3444.99 1854.96,3349.99 v2(2009.99,3350) ; C2.2@1971.57,2924.99 1972.07,2979.99 1972.07,2991.99 2009.96,3029.99 2199.97,3029.99 2269.97,3099.99 2269.97,3289.99 2229.97,3329.99 ; Q2.6@2215.59,3328.79 2228.76,3328.79 2259.97,3359.99 v2(2259.99,3710) 2260.16,3710.19 U7.3@2315.51,3710.19
  Bottom Layer w10: v2(2009.99,3350) 2034.97,3374.97 2034.97,3654.99 2089.98,3710 v2(2259.99,3710)
S3_IO0: BOOT.1 C3.2 Q2.3 RN1.9 U7.27 | length 1949.6
  Top Layer w7.99: BOOT.1@2265,2866.02 v1(2264.99,2920) ; U7.27@3004.49,3160.19 3054.76,3160.19 3090.16,3124.79 RN1.9@3241.35,3124.8
  Top Layer w10: Q2.3@2164.4,3401.22 v1(2164.41,3455) ; C3.2@2181.57,2919.99 v1(2264.99,2920) 2919.97,2919.99 3004.47,3004.49 U7.27@3004.49,3160.19
  Bottom Layer w10: v1(2164.41,3455) 2164.41,3020.58 v1(2264.99,2920)
S3_RXD: U3.26 U7.36 | length 1194.1
  Top Layer w7.99: U3.26@2163.6,3174.68 2189.66,3174.69 2219.97,3204.99 v1(2219.99,3220)
  Top Layer w10: v1(2934.99,3610) 2935.16,3610.19 U7.36@3004.49,3610.19
  Bottom Layer w10: v1(2219.99,3220) 2219.97,3499.99 2329.97,3609.99 v1(2934.99,3610)
S3_TXD: U3.25 U7.37 | length 1293.7
  Top Layer w10: U3.25@2163.6,3155 2209.97,3154.99 v1(2219.99,3165) ; v1(2934.99,3660) 3004.26,3659.99 U7.37@3004.49,3660.19
  Bottom Layer w10: v1(2219.99,3165) 2194.57,3190.49 2194.57,3519.49 2334.97,3659.99 v1(2934.99,3660)
SD_CS: RN1.3 U7.34 U8.2 | length 805.9
  Top Layer w10: U7.34@3004.49,3510.19 v1(3394.99,3510.19) ; RN1.3@3298.66,3149.99 3324.97,3149.99 3394.76,3219.79 U8.2@3394.76,3276.39 ; U8.2@3394.76,3276.29 3394.76,3339.69 v1(3394.99,3340)
  Bottom Layer w10: v1(3394.99,3340) v1@3395,3509.99
SD_MISO: RN1.1 U7.33 U8.7 | length 1198.9
  Top Layer w10: U7.33@3004.49,3460.19 3524.76,3460.19 3611.26,3373.79 U8.7@3611.26,3276.39 ; RN1.1@3298.66,3099.59 3349.57,3099.59 v1(3349.99,3100) ; v1(3609.99,3150) 3609.97,3275.59 U8.7@3610.76,3276.29
  Bottom Layer w10: v1@3349.97,3099.89 3400.08,3150 v1(3609.99,3150)
SD_MOSI: RN1.2 U7.31 U8.3 | length 749.6
  Top Layer w10: U7.31@3004.49,3360.19 3060.16,3360.19 3074.97,3374.99 3404.97,3374.99 3438.07,3341.99 U8.3@3438.07,3276.29 ; RN1.2@3298.66,3124.79 3334.86,3124.79 3438.07,3227.99 U8.3@3438.07,3276.39
SD_SCK: U7.32 U8.5 | length 628.9
  Top Layer w10: U7.32@3004.49,3410.19 3045.16,3410.19 3049.97,3414.99 3469.97,3414.99 3524.66,3360.39 U8.5@3524.66,3276.29
SWCLK: SWCLK.1 U1.24 | length 929.9
  Top Layer w7.99: U1.24@2793.31,2290.64 2850.57,2290.59 2884.97,2324.99 2884.97,2344.99 2904.97,2364.99 2929.97,2364.99 v1(2944.99,2380) ; v1(3489.99,2520) SWCLK.1@3489.97,2584.99
  Bottom Layer w7.99: v1(2944.99,2380) 3455,2380 3490,2415 v1(3489.99,2520)
SWD: SWD.1 U1.25 | length 1006
  Top Layer w7.99: U1.25@2793.31,2306.39 2846.36,2306.39 2869.97,2329.99 2869.97,2359.99 2889.97,2379.99 2914.97,2379.99 v1(2944.99,2410) ; v1(3489.99,2680) SWD.1@3489.97,2734.99
  Bottom Layer w7.99: v1(2944.99,2410) 3359.99,2410 3440,2490 3440,2630 v1(3489.99,2680)
U1_46: C19.2 R6.2 U1.46 | length 185.1
  Top Layer w7.99: R6.2@2400,2462.96 2412.97,2462.99 2424.97,2474.99 2474.97,2474.99 2481.57,2468.49 2481.57,2449.99 2511.76,2419.69 U1.46@2511.82,2385.12
U2_5: C21.1 L2.1 U2.5 | length 185.7
  Top Layer w20: U2.5@1907.27,2554.99 1984.96,2554.99 C21.1@1985,2558.46 2021.46,2558.49 2044.96,2534.99 L2.1@2079.76,2534.99
U2_6: C21.2 U2.6 | length 78.1
  Top Layer w20: U2.6@1907.27,2592.39 1908.07,2591.49 C21.2@1985,2591.53
U5_3: C6.2 R2.2 U5.3 | length 144.9
  Top Layer w10: R2.2@2942.07,2274.99 3000.66,2274.99 3012.16,2286.49 3008.47,2290.19 C6.2@3008.46,2355
U8_1: RN1.4 U8.1 | length 132.7
  Top Layer w10: RN1.4@3298.66,3175.19 3315.16,3175.19 3351.36,3211.39 U8.1@3351.36,3276.39
U8_8: RN1.6 U8.8 | length 573
  Top Layer w7.99: v1(3199.99,3200) RN1.6@3241.35,3200.39
  Top Layer w10: U8.8@3654.57,3276.39 3654.57,3200.39 v1(3654.99,3200)
  Bottom Layer w7.99: v1(3199.99,3200) v1(3654.99,3200)
UART_DTR: Q2.2 Q2.4 U3.28 | length 206.3
  Top Layer w10: U3.28@2163.6,3214.05 2163.57,3328.79 Q2.4@2164.41,3328.78 2164.36,3359.39 2189.97,3384.99 Q2.2@2189.97,3408.99
UART_RTS: Q2.1 Q2.5 U3.24 | length 374
  Top Layer w10: U3.24@2163.6,3135.31 2230.26,3135.29 2249.97,3154.99 2249.97,3239.99 2189.97,3299.99 Q2.5@2190,3328.78 ; Q2.5@2189.97,3330.99 2189.97,3349.99 2215.57,3375.59 Q2.1@2215.58,3401.22
UBRTG_DM: D3.1 U3.5 USB.5 USB.7 | length 674
  Top Layer w10: USB.5@1799.56,3576.48 1799.57,3620.49 1789.96,3629.99 1769.96,3629.99 1760.16,3620.19 USB.7@1760.18,3576.48 1760.16,3499.79 1859.96,3399.99 D3.1@1904.41,3400 1929.37,3374.99 2039.96,3374.99 2050.26,3364.79 U3.5@2050.31,3248.6
UBRTG_DP: D4.1 U3.4 USB.6 USB.8 | length 723.1
  Top Layer w10: v2(1724.99,3495) 1740.46,3510.49 USB.8@1740.5,3576.48 ; USB.6@1779.87,3576.48 1779.87,3525.09 v2(1809.99,3495) 1854.96,3449.99 D4.1@1904.41,3450 1904.37,3440.59 1919.96,3424.99 2044.96,3424.99 2069.97,3399.99 U3.4@2070,3248.6
  Bottom Layer w10: v2(1724.99,3495) v2(1809.99,3495)
USB_D+: R4.1 U1.52 | length 207
  Top Layer w7.99: R4.1@2332.76,2222.99 2350.97,2222.99 2392.97,2264.99 2468.36,2264.99 2493.97,2290.59 U1.52@2511.82,2290.64
USB_D-: R3.1 U1.51 | length 193.7
  Top Layer w7.99: R3.1@2332.76,2270.79 2378.66,2270.79 2387.86,2279.99 2463.57,2279.99 2489.97,2306.39 U1.51@2511.82,2306.39
USB_DM: R3.2 U7.13 | length 1115.1
  Top Layer w10: v1(2249.99,2385) 2249.97,2279.99 2259.16,2270.79 R3.2@2298.67,2270.83 ; U7.13@2315.51,3210.19 2315.66,3209.99 v1(2389.99,3210)
  Bottom Layer w10: v1(2249.99,2385) 2389.97,2524.99 v1(2389.99,3210)
USB_DP: R4.2 U7.14 | length 1061.7
  Top Layer w10: v1(2214.99,2385) 2214.97,2244.99 2236.97,2222.99 R4.2@2298.67,2222.96 ; U7.14@2315.51,3160.19 2329.97,3145.69 v1(2329.99,3040)
  Bottom Layer w10: v1(2214.99,2385) 2329.97,2499.99 v1(2329.99,3040)
VBUS: D2.2 D5.1 R9.2 USB.2 USB.11 | length 1393.2
  Top Layer w10: v1@1675.46,3529.49 v1@1675.46,3534.99 ; v2(1804.99,3150) R9.2@1867.96,3150 ; v1(1864.99,3535) 1864.96,3509.99 1874.96,3499.99 D5.1@1904.41,3499.99
  Top Layer w20: D2.2@1635,2691.62 1711.66,2691.59 1804.96,2784.89 v2(1804.99,3150) ; v1@1675.46,3534.99 USB.11@1675.54,3576.48 ; USB.2@1864.52,3576.48 v1(1864.99,3535)
  Bottom Layer w20: v1@1675.46,3534.99 v1(1675.51,3534.95) v1(1864.99,3535) 1864.96,3484.99 1804.96,3424.99 v2(1804.99,3150)
VBUS_SNS: R9.1 R18.2 U3.8 | length 130.1
  Top Layer w10: R9.1@1902.07,3149.99 1902.07,3199.99 1924.96,3199.99 1939.07,3214.09 U3.8@1976.4,3214.05
VIN: C25.2 C29.1 D1.1 D2.1 U2.2 U2.3 | length 581.8
  Top Layer w20: D2.1@1635,2518.38 D1.1@1635,2341.62 1638.07,2344.69 1814.96,2344.69 1812.46,2347.19 1812.46,2439.99 1812.77,2440.29 U2.3@1812.76,2517.6 ; C29.1@1810,2339.49 1815.01,2344.5 C29.1@1815,2344.64 ; U2.3@1812.77,2512.59 U2.2@1812.76,2555
VSYS: D1.2 K1.B1 | length 543.7
  Top Layer w20: v1(1635.01,2090) D1.2@1635,2168.38 ; v1(1635.01,2050) v1(1635.01,2090)
  Bottom Layer w20: K1.B1@1601.27,1678.69 1601.27,2016.29 v1(1635.01,2050) ; v1(1635.01,2050) v1(1635.01,2090)
XIN: C5.2 U1.21 U5.1 | length 312.1
  Top Layer w7.99: 2813.26,2243.39 2901.57,2243.39 2908.47,2236.59 C5.2@2908.47,2225 2908.47,2233.49 2919.97,2244.99 3033.86,2244.99 U5.1@3079.07,2199.89
XOUT: R2.1 U1.22 | length 101.4
  Top Layer w7.99: 2813.26,2258.89 2891.86,2258.89 R2.1@2907.96,2275
pads on no net: K1.A8 K1.A14 K1.A15 K1.A16 K1.A21 K1.A22 LED.4 RN1.7 RN1.8 U1.29 U1.31 U1.35 U1.36 U1.37 U1.43 U1.55 U1.56 U1.57 U1.58 U1.59 U3.1 U3.2 U3.10 U3.11 U3.12 U3.13 U3.14 U3.15 U3.16 U3.17 U3.18 U3.19 U3.20 U3.21 U3.22 U3.27 U7.6 U7.7 U7.8 U7.9 U7.10 U7.11 U7.12 U7.15 U7.16 U7.17 U7.18 U7.19 U7.20 U7.21 U7.22 U7.23 U7.24 U7.26 U7.28 U7.29 U7.30 U7.35 U7.38 U7.39 U8. U8.9 USB. USB.3 USB.9

## Polygon pours and split planes (outlines as drawn)
GND on Bottom Layer (solid): 1505,3863.26 3796.33,3863.26 3796.33,1859.33 1505,1859.33
GND on Top Layer (solid): 1505,3863.26 3796.33,3863.26 3796.33,1859.33 1505,1859.33